# Altium PCB TM_DE_Display_REV1.0.PcbDoc (part 2 of 2)
Units mm, origin at the board's own origin, x right, y up, seen from the top; angles counter-clockwise.
Board outline 155.6 x 46.6 mm, 2 copper layers (Top Layer, Bottom Layer); 284 components, 274 nets, 1006 pads, 129 vias.
Unrouted connection lines stored in the file: 576.
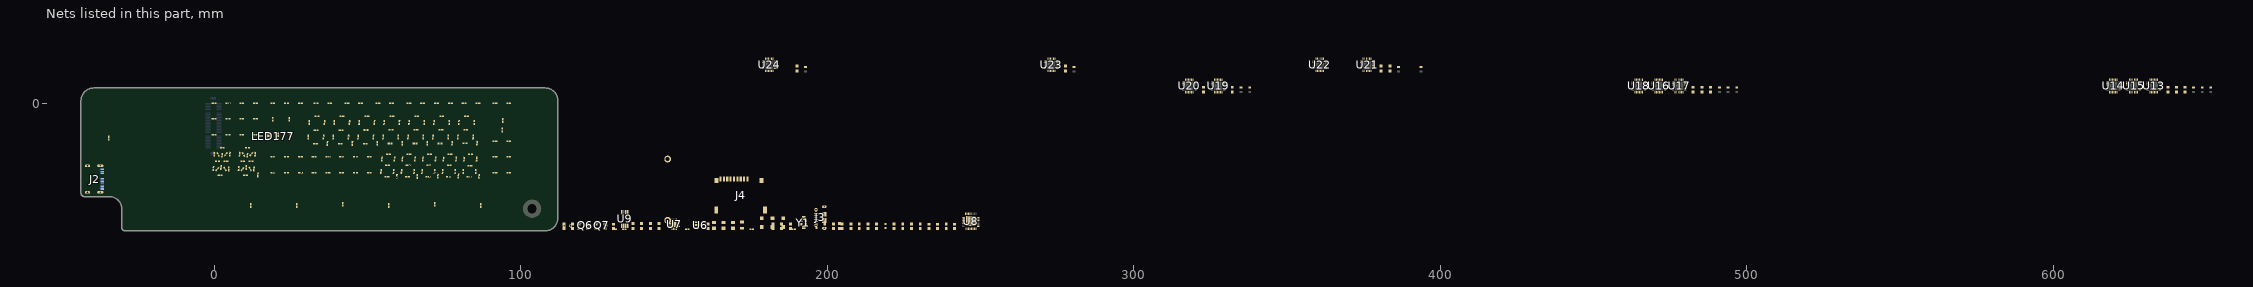
[diagram p2: the nets of this part, all layers, seen from the top]

## Part data
BT1: "BATTERY HOLDER FOR CR2032 HORIZONTAL FEMALE", MANUFACTURER=CONNFLY, Manufacturer Part Number=DS1092-04-B6P, Supplier 1=Ozdisan
C33: library part C01757, "CAP CER 1UF 25VDC %10 X5R SMD", MANUFACTURER=Samsung, Voltage=25V, Manufacturer Part Number=CL10A105KA8NNNC
C34 C35 C36: library part C01758, "MLCC (2012) 0805 22uF 10VDC ±20% X5R", MANUFACTURER=Samsung, Voltage=10V, Manufacturer Part Number=CL21A226MPCLRNC
C37 C38 C39 C40: "MLCC (1608) 0603 100nF 50VDC ±10% X7R", MANUFACTURER="Samsung Electro-Mechanics America, Inc", Manufacturer Part Number=CL10B104KB8NNNL, Supplier 1=OZDISAN
C41 C42 C43 C44 C55 C56 C79 C80 C81 C82 C83 C84 C85 C86 C87 C88 C89 C90: library part C01763, "CAP CER 100nF 50VDC %10 X7R SMD", MANUFACTURER=Samsung, Manufacturer Part Number=CL10B104KB8NNNL, Voltage=50V
C45 C52: library part C01763, "MLCC (1608) 0603 15pF 50VDC ±5% C0G (NP0)", MANUFACTURER=Samsung, Voltage=50V, Manufacturer Part Number=CL10C150JB8NNNC
C46 C49: library part C01763, "MLCC (1608) 0603 47pF 50VDC ±5% C0G (NP0)", MANUFACTURER=Samsung, Voltage=50V, Manufacturer Part Number=CL10C470JB8NNNC
C47 C50: library part C01763, "MLCC (1608) 0603 180pF 50VDC ±5% C0G (NP0)", MANUFACTURER=Samsung, Voltage=50V, Manufacturer Part Number=CL10C181JB8NNNC
C48 C51: "MLCC (1608) 0603 10pF 50VDC ±0.25pF C0G (NP0)", MANUFACTURER=SAMSUNG, Manufacturer Part Number=CL10C100CB8NNNC, Supplier 1=Ozdisan
C53 C54 C57 C58: "MLCC (1608) 0603 18pF 50VDC ±5% C0G (NP0)", MANUFACTURER="Samsung Electro-Mechanics America, Inc", Manufacturer Part Number=CL10C180JB8NNNC, Supplier 1=OZDISAN
D13: "DIODE SCHOTTKY 40V 1A SOD123", MANUFACTURER="Nexperia USA Inc.", Manufacturer Part Number=PMEG4010EGWJ
D14 D15 D16: "TVS Diode (Bi-directional)", MANUFACTURER="Comchip Technology", Manufacturer Part Number=ATV02W5V0B-HF
J1: "60 Position Connector Receptacle, Center Strip Contacts Surface Mount Gold", Package=None, Check_prices=https://www.snapeda.com/parts/DF12NB(3.0)-60DS-0.5V(51)/Hirose/view-part/?ref=eda, MF="Hirose Electric Co Ltd", MP=DF12NB(3.0)-60DS-0.5V(51), SnapEDA_Link=https://www.snapeda.com/parts/DF12NB(3.0)-60DS-0.5V(51)/Hirose/view-part/?ref=snap
J2: library part TYPE-C-31-M-12, "CONN RCPT Type-C 16POS SMD R/A", MANUFACTURER="SHOU HAN", Manufacturer Part Number="TYPE-C 16PIN 2MD(073)"
J3: "Micro USB, Input Output Connectors, B TYPE RECEPTACLE with flange", Package=None, Check_prices=https://www.snapeda.com/parts/10118194-0001LF/Amphenol+FCI/view-part/?ref=eda, MF="Amphenol ICC", MP=10118194-0001LF, SnapEDA_Link=https://www.snapeda.com/parts/10118194-0001LF/Amphenol+FCI/view-part/?ref=snap
J4: "Connector", Part Number=L-KLS1-TF-003-H1.85-R, Ordering=https://www.ozdisan.com/konnektor-baglanti-elemanlari/sim-sd-kart-konnektorleri/sd-kart-konnektorleri/L-KLS1-TF-003-H1-85-R, PRICE=0,26439, Unit=USD
L4 L5: "FIXED IND 2.2UH 700MA 300 MOHM", MANUFACTURER="Murata Electronics", Manufacturer Part Number=LQM18PN2R2NC0L
LED1 LED2 LED3 LED4 LED5 LED6 LED7 LED8 LED9 LED10 LED11 LED12 LED13 LED14 LED15 LED16 LED17 LED18 LED19 LED20 LED21 LED22 LED23 LED24 LED25 LED26 LED27 LED28 LED29 LED30 LED31 LED32 LED33 LED34 LED35 LED36 LED37 LED38 LED39 LED40 LED41 LED42 LED43 LED44 LED45 LED46 LED47 LED48 LED49 LED50 LED51 LED52 LED53 LED54 LED55 LED56 LED57 LED58 LED59 LED60 LED61 LED62 LED63 LED64 LED65 LED66 LED67 LED68 LED69 LED70 LED71 LED72 LED73 LED74 LED75 LED76 LED77 LED78 LED79 LED80 LED81 LED82 LED83 LED84 LED85 LED86 LED87 LED88 LED89 LED90 LED91 LED92 LED93 LED94 LED95 LED96 LED97 LED98 LED99 LED100 LED101 LED102 LED103 LED104 LED105 LED106 LED107 LED108 LED109 LED110 LED111 LED112 LED113 LED114 LED115 LED116 LED117 LED118 LED119 LED120 LED121 LED122 LED123 LED124 LED125 LED126 LED127 LED128 LED129 LED130 LED131 LED132 LED133 LED134 LED135 LED136 LED137 LED138 LED139 LED140 LED141 LED142 LED143 LED144 LED145 LED146 LED147 LED148 LED149 LED150 LED151 LED152 LED153 LED154 LED155 LED156 LED157 LED158 LED159 LED160 LED161 LED162 LED163 LED164 LED165 LED166 LED167 LED168 LED169 LED170 LED172 LED173 LED174 LED175 LED176 LED178 LED179 LED180 LED181 LED182 LED183 LED184 LED185 LED186 LED187 LED188 LED189: "LED RED WATER CLEAR 0402 SMD", MANUFACTURER=Kingbright, Manufacturer Part Number=YLED0402R
LED171: "LED WHITE YELLOW LENS 0402 SMD", MANUFACTURER=LITEON, Manufacturer Part Number=LTW-C283DS5
LED177: "LED", Manufacturer_Name=Lumileds, Mouser Part Number=997-L1MCRGB00280MP, Arrow Part Number=L1MC-RGB0028000MP0, Arrow Price/Stock=https://www.arrow.com/en/products/l1mc-rgb0028000mp0/lumileds.html?utm_currency=USD&region=nac, Datasheet Link=https://lumileds.com/wp-content/uploads/2022/03/DS388-luxeon-3528-rgb-datasheet.pdf, Height=1.85mm, Manufacturer_Part_Number=L1MC-RGB0028000MP0, Mouser Price/Stock=https://www.mouser.co.uk/ProductDetail/Lumileds/L1MC-RGB0028000MP0?qs=Znm5pLBrcAJSGF05jr80lQ%3D%3D
Q6 Q7: "TRANSISTOR DIS.500mA 300V NPN SOT23 GEN. SMT", MANUFACTURER=PANJIT, Package=SOT23, Supplier Part Number 1=3757-MMBTA42_R1_00001CT-ND, Manufacturer Part Number=MMBTA42_R1_00001, Supplier 1=DIGIKEY, Supplier 2=MOUSER, Supplier 3=OZDISAN, Supplier Part Number 3=MMBTA42_R1_00001
R32 R33 R35 R36 R37: library part R03000, "RES.(1005) 0402 10K Ohms 5% 1/16W 100PPM SMT", MANUFACTURER=YAGEO, Manufacturer Part Number=RC0402JR-0710KL
R34: library part R01913, "RES SMD 2.2M OHM 1% 1/8W 0805", MANUFACTURER=Yageo, Manufacturer Part Number=RC0805FR-072M2L
R38 R39: "RES.(1608) 0603 47K Ohms 1% 1/10W-S 100PPM", MANUFACTURER=ROYALOHM, Manufacturer Part Number=0603SAF4702T5E, Supplier 1=Ozdisan
R52 R55: library part R02995, "RES 0603 10k Ohms %1 1/10W 100PPM", MANUFACTURER=ROYALOHM, Manufacturer Part Number=0603SAF1002T5E
R53: library part R02995, "RES.(1608) 0603 820 Ohms 5% 1/10W-S 100PPM", MANUFACTURER=ROYALOHM, Manufacturer Part Number=0603SAJ0821T5E
R54: library part R02995, "RES 5.1K OHM 1% 1/10W 0603", MANUFACTURER=YAGEO, Manufacturer Part Number=RC0603FR-075K1L
R56 R57: "RES.(1608) 0603 330 Ohms 1% 1/10W-S 100PPM", MANUFACTURER=ROYALOHM, Manufacturer Part Number=0603SAF3300T5E, Supplier 1=Ozdisan
R77 R78 R79 R80 R81 R82 R83 R84 R85 R86 R87 R88: library part 0603SAF3301T5E, "RES.(1608) 0603 3.6K Ohms 1% 1/10W 100PPM SMT", MANUFACTURER=YAGEO, Manufacturer Part Number=RC0603FR-133K6L
U6: "Low Loss Power Distribution Switch", MANUFACTURER="DIOO Microcircuits", Manufacturer Part Number=DIO7002AST5
U7: "USB to High-Speed Serial Chip CH343", MANUFACTURER=WCH, Package=Package, Check_prices=https://www.snapeda.com/parts/CH343P/WCH/view-part/?ref=eda, Manufacturer Part Number=CH343P, SnapEDA_Link=https://www.snapeda.com/parts/CH343P/WCH/view-part/?ref=snap
U8: "Integrated Circuit", Manufacturer_Name=NXP, Mouser Part Number=771-MFRC52201HN1115, Arrow Part Number=MFRC52201HN1,115, Arrow Price/Stock=https://www.arrow.com/en/products/mfrc52201hn1115/nxp-semiconductors?utm_currency=USD&region=nac, Datasheet Link=https://media.digikey.com/pdf/Data%20Sheets/NXP%20PDFs/MFRC522.pdf, Height=1mm, Manufacturer_Part_Number=MFRC52201HN1,115, Mouser Price/Stock=https://www.mouser.co.uk/ProductDetail/NXP-Semiconductors/MFRC52201HN1115?qs=cbprxTG2Yq8gosQeFVBvCQ%3D%3D
U9: "Real Time Clock (RTC) IC Clock/Calendar 64B, 1Kb I²C, 2-Wire Serial 8-TSSOP, 8-MSOP (0.118\", 3.00mm Width)", MANUFACTURER="Microchip Technology", Manufacturer Part Number=MCP79410T-I/MS, Supplier 1=DIGIKEY
U13 U14 U15 U16 U17 U18 U19 U20 U21 U22 U23 U24: "Integrated Circuit", Manufacturer_Name=onsemi, Mouser Part Number=698-CAT4016HV6-GT2, Arrow Part Number=CAT4016HV6-GT2, Arrow Price/Stock=https://www.arrow.com/en/products/cat4016hv6-gt2/on-semiconductor, Datasheet Link=https://www.onsemi.com/download/data-sheet/pdf/cat4016-d.pdf, Height=0.8mm, Manufacturer_Part_Number=CAT4016HV6-GT2, Mouser Price/Stock=https://www.mouser.co.uk/ProductDetail/onsemi/CAT4016HV6-GT2?qs=rZgeL6XvLwaPp0eUTTX%2FiA%3D%3D
XTAL1: "CRYSTAL 32.768KHZ 12.5pF BULK 5ppm 3X8 EXT", MANUFACTURER=RALTRON, Manufacturer Part Number=R38-32.768-12.5-EXT-5PPM, Supplier 1=OZDISAN
Y1: "27.12 MHz ±10ppm Crystal 10pF 60 Ohms 4-SMD, No Lead", MANUFACTURER=ECS, Height=0.55mm, Manufacturer Part Number=ECS-271.2-10-37-CKM-TR

## Free pads (board coordinates)
  round 6 hole 3 mask+1: 6(103.734,-34.4)

## Via types
v1: diameter 0.254, hole 0.127, Top Layer to Bottom Layer, tented both sides, 128 vias
v2: diameter 0.6, hole 0.3, Top Layer to Bottom Layer, tented both sides, 1 vias

## Nets (pads, with @x,y where several pads share a name; then routed paths per layer and width w, separated by ;. In a path a pad name is that pad's centre, name@x,y a point inside that pad or via, vN(x,y) a via of type N, cw(c..) or ccw(c..) an arc to the next point about the centre after c; other vN are vias at no path point)
+3V3: C55.1 C56.2 J4.4 R55.1 U9.8
+3V3DC: C37.2 C38.2 C39.2 C44.2 R52.1 U7.1 U7.3 U7.6 U8.2 U8.3 U8.12 U8.15 U8.32
+5VDC: C79.1 C80.1 C81.1 C82.1 C83.1 C84.1 C85.1 C86.1 C87.1 C88.1 C89.1 C90.1 LED1.2 LED2.2 LED3.2 LED4.2 LED5.2 LED6.2 LED7.2 LED8.2 LED9.2 LED10.2 LED11.2 LED12.2 LED13.2 LED14.2 LED15.2 LED16.2 LED17.2 LED18.2 LED19.2 LED20.2 LED21.2 LED22.2 LED23.2 LED24.2 LED25.2 LED26.2 LED27.2 LED28.2 LED29.2 LED30.2 LED31.2 LED32.2 LED33.2 LED34.2 LED35.2 LED36.2 LED37.2 LED38.2 LED39.2 LED40.2 LED41.2 LED42.2 LED43.2 LED44.2 LED45.2 LED46.2 LED47.2 LED48.2 LED49.2 LED50.2 LED51.2 LED52.2 LED53.2 LED54.2 LED55.2 LED56.2 LED57.2 LED58.2 LED59.2 LED60.2 LED61.2 LED62.2 LED63.2 LED64.2 LED65.2 LED66.2 LED67.2 LED68.2 LED69.2 LED70.2 LED71.2 LED72.2 LED73.2 LED74.2 LED75.2 LED76.2 LED77.2 LED78.2 LED79.2 LED80.2 LED81.2 LED82.2 LED83.2 LED84.2 LED85.2 LED86.2 LED87.2 LED88.2 LED89.2 LED90.2 LED91.2 LED92.2 LED93.2 LED94.2 LED95.2 LED96.2 LED97.2 LED98.2 LED99.2 LED100.2 LED101.2 LED102.2 LED103.2 LED104.2 LED105.2 LED106.2 LED107.2 LED108.2 LED109.2 LED110.2 LED111.2 LED112.2 LED113.2 LED114.2 LED115.2 LED116.2 LED117.2 LED118.2 LED119.2 LED120.2 LED121.2 LED122.2 LED123.2 LED124.2 LED125.2 LED126.2 LED127.2 LED128.2 LED129.2 LED130.2 LED131.2 LED132.2 LED133.2 LED134.2 LED135.2 LED136.2 LED137.2 LED138.2 LED139.2 LED140.2 LED141.2 LED142.2 LED143.2 LED144.2 LED145.2 LED146.2 LED147.2 LED148.2 LED149.2 LED150.2 LED151.2 LED152.2 LED153.2 LED154.2 LED155.2 LED156.2 LED157.2 LED158.2 LED159.2 LED160.2 LED161.2 LED162.2 LED163.2 LED164.2 LED165.2 LED166.2 LED167.2 LED168.2 LED170.2 LED171.2 LED174.2 LED176.2 LED177.2 LED177.4 LED177.6 LED180.2 LED182.2 R35.2 U6.3 U6.5 U13.24 U14.24 U15.24 U16.24 U17.24 U18.24 U19.24 U20.24 U21.24 U22.24 U23.24 U24.24
  other v1: 19.55,-17.5 37.549,-17.5 46.549,-17.5 24.734,-10.4
/km1: LED168.1 U22.9
/km2: LED170.1 U22.10
A1: LED17.1 U15.5
A2: LED47.1 U18.5
A_1: LED1.1 U13.5
A_2: LED31.1 U13.13
A_3: LED62.1 U16.5
A_4: LED78.1 U16.13
A_5: LED94.1 U20.5
A_6: LED110.1 U20.13
A_7: LED9.1 U14.5
A_8: LED39.1 U14.13
A_9: LED70.1 U17.5
A_10: LED86.1 U17.13
A_11: LED102.1 U19.5
A_12: LED118.1 U19.13
B1: LED18.1 U15.6
B2: LED48.1 U18.6
B_1: LED2.1 U13.6
B_2: LED32.1 U13.14
B_3: LED63.1 U16.6
B_4: LED79.1 U16.14
B_5: LED95.1 U20.6
B_6: LED111.1 U20.14
B_7: LED10.1 U14.6
B_8: LED40.1 U14.14
B_9: LED71.1 U17.6
B_10: LED87.1 U17.14
B_11: LED103.1 U19.6
B_12: LED119.1 U19.14
Bed1: LED156.1 U22.15
C1: LED19.1 U15.7
C2: LED49.1 U18.7
C_1: LED3.1 U13.7
C_2: LED33.1 U13.15
C_3: LED64.1 U16.7
C_4: LED80.1 U16.15
C_5: LED96.1 U20.7
C_6: LED112.1 U20.15
C_7: LED11.1 U14.7
C_8: LED41.1 U14.15
C_9: LED72.1 U17.7
C_10: LED88.1 U17.15
  other v1: 71.884,-22.693
C_11: LED104.1 U19.7
  other v1: 78.591,-22.708
C_12: LED120.1 U19.15
CHF1: LED144.1 U21.11
CHF2: LED147.1 U21.12
Clock1: LED160.1 U22.16
D1: LED20.1 U15.8
D2: LED50.1 U18.8
D_1: LED4.1 U13.8
D_2: LED34.1 U13.16
D_3: LED65.1 U16.8
D_4: LED81.1 U16.16
D_5: LED97.1 U20.8
D_6: LED113.1 U20.16
D_7: LED12.1 U14.8
D_8: LED42.1 U14.16
D_9: LED73.1 U17.8
D_10: LED89.1 U17.16
  other v1: 70.192,-23.928
D_11: LED105.1 U19.8
  other v1: 76.9,-23.943
D_12: LED121.1 U19.16
  other v1: 83.607,-23.957
Distance1: LED169.1 U24.5
Distance2: LED172.1 U24.6
Distance3: LED173.1 U24.7
Distance4: LED175.1 U24.8
Distance5: LED178.1 U24.9
Distance6: LED179.1 U24.10
  other v1: 28.55,-22.6
Distance7: LED181.1 U24.11
Distance8: LED183.1 U24.12
  other v1: 19.55,-22.6
DP2: LED61.1 U18.19
DP_1: LED8.1 U13.12
DP_2: LED38.1 U13.20
DP_3: LED69.1 U16.12
DP_4: LED85.1 U16.20
DP_5: LED101.1 U20.12
DP_6: LED117.1 U20.20
DP_7: LED16.1 U14.12
DP_8: LED46.1 U14.20
  other v1: 59.568,-24.256
DP_9: LED77.1 U17.12
DP_10: LED93.1 U17.20
DP_11: LED109.1 U19.12
DP_12: LED125.1 U19.20
DTR: Q6.2 R37.2 R38.1 U7.12
E1: LED21.1 U15.9
E2: LED51.1 U18.9
E_1: LED5.1 U13.9
E_2: LED35.1 U13.17
E_3: LED66.1 U16.9
E_4: LED82.1 U16.17
E_5: LED98.1 U20.9
E_6: LED114.1 U20.17
E_7: LED13.1 U14.9
E_8: LED43.1 U14.17
E_9: LED74.1 U17.9
E_10: LED90.1 U17.17
E_11: LED106.1 U19.9
E_12: LED122.1 U19.17
EARTH: J2.S1 J2.S2 J2.S3 J2.S4 R34.1
EEM1: LED165.1 U15.19
EEM2: LED167.1 U15.20
EuroBOT1: LED180.1 U22.13
EuroBOT2: LED182.1 U22.14
EuroTOP1: LED162.1 U22.7
EuroTOP2: LED164.1 U22.8
Extras1: LED139.1 U21.13
Extras2: LED142.1 U21.14
  other v1: 42.049,-17.5
Extras3: LED145.1 U21.15
Extras4: LED148.1 U21.16
Extras5: LED149.1 U21.17
Extras6: LED152.1 U21.18
Extras7: LED154.1 U21.19
Extras8: LED155.1 U21.20
F1: LED22.1 U15.10
F2: LED52.1 U18.10
F_1: LED6.1 U13.10
F_2: LED36.1 U13.18
F_3: LED67.1 U16.10
F_4: LED83.1 U16.18
F_5: LED99.1 U20.10
F_6: LED115.1 U20.18
F_7: LED14.1 U14.10
F_8: LED44.1 U14.18
F_9: LED75.1 U17.10
F_10: LED91.1 U17.18
F_11: LED107.1 U19.10
F_12: LED123.1 U19.18
Fare1: LED127.1 U21.5
Fare2: LED130.1 U21.6
Fare3: LED133.1 U21.7
Fare4: LED137.1 U21.8
Fare5: LED138.1 U21.9
Fare6: LED141.1 U21.10
Forhere1: LED140.1 U23.17
Forhere2: LED143.1 U23.18
Forhere3: LED146.1 U23.19
G1.1: LED23.1 U15.11
G1.2: LED24.1 U15.12
G2.1: LED53.1 U18.11
G2.2: LED54.1 U18.12
G_1: LED7.1 U13.11
G_2: LED37.1 U13.19
G_3: LED68.1 U16.11
G_4: LED84.1 U16.19
G_5: LED100.1 U20.11
G_6: LED116.1 U20.19
G_7: LED15.1 U14.11
G_8: LED45.1 U14.19
G_9: LED76.1 U17.11
  other v1: 63.751,-20.265
G_10: LED92.1 U17.19
  other v1: 70.451,-20.275
G_11: LED108.1 U19.11
G_12: LED124.1 U19.19
GND: BT1.1 C33.2 C34.2 C35.2 C36.2 C37.1 C38.1 C39.1 C40.1 C42.1 C43.1 C44.1 C46.2 C47.2 C48.1 C49.1 C50.1 C51.2 C53.1 C54.1 C55.2 C56.1 C57.1 C58.1 C79.2 C80.2 C81.2 C82.2 C83.2 C84.2 C85.2 C86.2 C87.2 C88.2 C89.2 C90.2 D14.1 D15.1 D16.1 J2.A1_B12 J2.B1_A12 J3.4 J3.5 J3.SH1 J3.SH2 J3.SH3 J3.SH4 J3.SH5 J3.SH6 J4.6 J4.10 R32.1 R33.1 R34.2 U6.2 U7.2 U7.17 U8.1 U8.4 U8.5 U8.10 U8.14 U8.18 U8.33 U9.4 U13.1 U14.1 U15.1 U16.1 U17.1 U18.1 U19.1 U20.1 U21.1 U22.1 U23.1 U24.1 Y1.2 Y1.4
H1: LED25.1 U15.13
H2: LED55.1 U18.13
Hired1: LED126.1 U23.5
Hired2: LED129.1 U23.6
Hired3: LED132.1 U23.7
Hired4: LED135.1 U23.8
J1: LED26.1 U15.14
J2: LED56.1 U18.14
K1: LED27.1 U15.15
K2: LED57.1 U18.15
km1: LED174.1 U22.11
km2: LED176.1 U22.12
L1: LED28.1 U15.16
L2: LED58.1 U18.16
LED_BLANK: U13.21 U14.21 U15.21 U16.21 U17.21 U18.21 U19.21 U20.21
LED_DATA_OUT1: U13.22 U16.2
LED_DATA_OUT2: U16.22 U20.2
LED_DATA_OUT3: U14.2 U20.22
LED_DATA_OUT4: U14.22 U17.2
LED_DATA_OUT5: U17.22 U19.2
LED_DATA_OUT6: U15.2 U19.22
LED_DATA_OUT7: U15.22 U18.2
LED_DATA_OUT9: U21.22 U23.2
LED_DATA_OUT10: U23.22 U24.2
LED_DATA_OUT11: U22.2 U24.22
LED_DR_CLK: U13.3 U14.3 U15.3 U16.3 U17.3 U18.3 U19.3 U20.3
LED_DR_DATA: U13.2
LED_DR_LATCH: U13.4 U14.4 U15.4 U16.4 U17.4 U18.4 U19.4 U20.4
M1: LED29.1 U15.17
M2: LED59.1 U18.17
N1: LED30.1 U15.18
N2: LED60.1 U18.18
NetBT1_2: BT1.2 U9.3
NetC34_1: C34.1 C35.1 C36.1 J3.1 U6.1
NetC41_2: C41.2 R54.2
NetC45_2: C45.2 C46.1 L4.2
NetC49_2: C49.2 C52.2 L5.2
NetC57_2: C57.2 U9.1 XTAL1.2
NetC58_2: C58.2 U9.2 XTAL1.1
NetJ2_A5: J2.A5 R32.2
NetJ2_B5: J2.B5 R33.2
NetLED169_2: LED169.2 LED172.2 LED173.2 LED175.2 LED178.2 LED179.2 LED181.2 LED183.2
NetLED184_2: LED184.2 LED185.2 LED186.2 LED187.2 LED188.2 LED189.2
NetQ6_1: Q6.1 R36.1 R38.2
NetQ6_3: Q6.3
NetQ7_1: Q7.1 R37.1 R39.2
NetQ7_3: Q7.3
NetR35_1: R35.1 U6.4
NetR56_1: R56.1 U9.6
NetR57_1: R57.1 U9.5
NetR77_1: R77.1 U13.23
NetR78_1: R78.1 U14.23
NetR79_1: R79.1 U15.23
NetR80_1: R80.1 U16.23
NetR81_1: R81.1 U17.23
NetR82_1: R82.1 U18.23
NetR83_1: R83.1 U19.23
NetR84_1: R84.1 U20.23
NetR85_1: R85.1 U21.23
NetR86_1: R86.1 U22.23
NetR87_1: R87.1 U23.23
NetR88_1: R88.1 U24.23
NetU18_22: U18.22 U21.2
NFC1: LED171.1 U22.17
NH1: LED157.1 U22.5
NH2: LED158.1 U22.6
OSCIN: C53.2 U8.21 Y1.1
OSCOUT: C54.2 U8.22 Y1.3
Rate1: LED159.1 U23.13
Rate2: LED161.1 U23.14
Rate3: LED163.1 U23.15
Rate4: LED166.1 U23.16
RF_ANT1: C41.1 C45.1 C47.1 C48.2
RF_ANT2: C50.2 C51.1 C52.1
RFID_CS: U8.24
RFID_IRQ: U8.23
RFID_MISO: U8.31
RFID_MOSI: U8.30
RFID_RST: C43.2 R52.2 U8.6
RFID_SCK: U8.29
RGB_Blue: LED177.5 U22.18
RGB_Green: LED177.1 U22.20
RGB_Red: LED177.3 U22.19
RTC_I2C_SCL: R56.2
RTC_I2C_SDA: R57.2
RTS: Q7.2 R36.2 R39.1 U7.13
RX: R53.2 R54.1 U8.17
Service1: LED151.1 U23.20
  other v1: 19.134,-5.2
SSP0_DETECT: J4.9 R55.2
SSP_CLK: J4.5
SSP_CMD: J4.3
SSP_DATA0: J4.7
SSP_DATA1: J4.8
SSP_DATA2: J4.1
SSP_DATA3: J4.2
Stopped1: LED128.1 U23.9
Stopped2: LED131.1 U23.10
Stopped3: LED134.1 U23.11
  other v1: 4.95,0
Stopped4: LED136.1 U23.12
Taxi1: LED150.1 U24.19
Taxi2: LED153.1 U24.20
Touch1: LED184.1 U24.13
Touch2: LED185.1 U24.14
Touch3: LED186.1 U24.15
Touch4: LED187.1 U24.16
Touch5: LED188.1 U24.17
Touch6: LED189.1 U24.18
TX1: L4.1 U8.11
TX2: L5.1 U8.13
USB2UART_RX: U7.5
USB2UART_TX: U7.4
USB_5V: C33.1 C40.2 D13.1 U7.9
USB_DBG_D_N: D16.2 J2.A7 J2.B7 U7.8
USB_DBG_D_P: D15.2 J2.A6 J2.B6 U7.7
USBD_N: J3.3
USBD_N: J3.2
VBUSA: D13.2 D14.2 J2.A4_B9 J2.B4_A9
VMID: C42.2 R53.1 U8.16
pads on no net: J1.1 J1.2 J1.3 J1.4 J1.5 J1.6 J1.7 J1.8 J1.9 J1.10 J1.11 J1.12 J1.13 J1.14 J1.15 J1.16 J1.17 J1.18 J1.19 J1.20 J1.21 J1.22 J1.23 J1.24 J1.25 J1.26 J1.27 J1.28 J1.29 J1.30 J1.31 J1.32 J1.33 J1.34 J1.35 J1.36 J1.37 J1.38 J1.39 J1.40 J1.41 J1.42 J1.43 J1.44 J1.45 J1.46 J1.47 J1.48 J1.49 J1.50 J1.51 J1.52 J1.53 J1.54 J1.55 J1.56 J1.57 J1.58 J1.59 J1.60 J1.S1 J1.S2 J2. J2.A8 J2.B8 J4.0 R77.2 R78.2 R79.2 R80.2 R81.2 R82.2 R83.2 R84.2 R85.2 R86.2 R87.2 R88.2 U7.10 U7.11 U7.14 U7.15 U7.16 U8.7 U8.8 U8.9 U8.19 U8.20 U8.25 U8.26 U8.27 U8.28 U9.7 U13.25 U14.25 U15.25 U16.25 U17.25 U18.20 U18.25 U19.25 U20.25 U21.3 U21.4 U21.21 U21.25 U22.3 U22.4 U22.21 U22.22 U22.25 U23.3 U23.4 U23.21 U23.25 U24.3 U24.4 U24.21 U24.25
copper on no net: | length 346.1
  Top Layer w0.254: -42.85,-17.49 ccw(c-41.58,-17.49) -41.58,-18.76 -41.072,-18.76 -35.992,-18.76 cw(c-35.992,-20.03) -34.722,-20.03 -34.722,-23.078 -34.722,-27.65 ccw(c-32.436,-27.65) -32.436,-29.936 -32.182,-29.936 cw(c-32.182,-32.476) -29.642,-32.476 -29.642,-38.826 ccw(c-28.118,-38.826) -28.118,-40.35 -25.578,-40.35 ccw(c-25.578,-38.826) -24.054,-38.826 -24.054,-24.094 -24.054,1.56 ccw(c-26.594,1.56) -26.594,4.1 -38.786,4.1 -40.31,4.1 ccw(c-40.31,1.56) -42.85,1.56 -42.85,0.036 -42.85,-16.474 -42.85,-17.49 ; -42.088,-16.982 ccw(c-40.818,-16.982) -40.818,-18.252 -35.484,-18.252 cw(c-35.484,-19.522) -34.214,-19.522 -34.214,-28.158 ccw(c-32.944,-28.158) -32.944,-29.428 -30.15,-29.428 cw(c-30.15,-30.698) -28.88,-30.698 -28.88,-38.572 ccw(c-28.118,-38.572) -28.118,-39.334 -25.578,-39.334 ccw(c-25.578,-38.826) -25.07,-38.826 -25.07,1.814 ccw(c-26.34,1.814) -26.34,3.084 -40.818,3.084 ccw(c-40.818,1.814) -42.088,1.814 -42.088,0.29 -42.088,-16.982 ; -41.58,-15.966 ccw(c-41.326,-15.966) -41.326,-16.22 ccw(c-40.056,-16.22) -40.056,-17.49 -34.722,-17.49 cw(c-34.722,-18.76) -33.452,-18.76 -33.452,-28.158 ccw(c-32.69,-28.158) -32.69,-28.92 -29.388,-28.92 cw(c-29.388,-29.936) -28.372,-29.936 -28.372,-38.064 ccw(c-27.61,-38.064) -27.61,-38.826 -26.086,-38.826 ccw(c-26.086,-38.318) -25.578,-38.318 -25.578,1.306 ccw(c-26.848,1.306) -26.848,2.576 -40.31,2.576 ccw(c-40.31,1.306) -41.58,1.306 -41.58,0.29 -41.58,-15.966
  other v1: 63.492,-23.918 85.299,-22.723 81.211,-22.704 65.183,-22.684 67.796,-22.674 74.503,-22.689 61.095,-22.665 24.05,-22.6 33.05,-22.6 37.549,-22.6 42.049,-22.6 46.549,-22.6 51.049,-22.6 92.05,-22.6 96.55,-22.6 83.866,-20.304 77.159,-20.29 74.79,-18.684 81.498,-18.699 61.382,-18.66 68.083,-18.669 85.604,-18.662 72.189,-18.632 78.896,-18.647 65.488,-18.623 24.05,-17.5 28.55,-17.5 33.05,-17.5 51.049,-17.5 92.05,-17.5 96.55,-17.5 84.069,-16.678 70.654,-16.649 77.362,-16.664 63.954,-16.639 45.044,-13.519 53.183,-13.513 61.319,-13.497 69.462,-13.497 77.601,-13.491 85.737,-13.475 41.589,-13.147 49.727,-13.14 57.863,-13.125 66.007,-13.125 74.145,-13.118 82.281,-13.102 92.05,-12.4 96.55,-12.4 38.796,-11.487 46.934,-11.481 55.07,-11.465 63.214,-11.465 43.774,-11.462 51.913,-11.455 60.049,-11.44 68.192,-11.44 71.353,-11.459 79.489,-11.443 76.331,-11.433 84.467,-11.418 0.45,-10.2 4.95,-10.2 9.45,-10.2 13.95,-10.2 41.853,-8.727 49.991,-8.721 58.127,-8.705 66.271,-8.705 74.409,-8.698 82.545,-8.683 39.126,-6.763 44.104,-6.763 47.265,-6.756 52.243,-6.756 55.4,-6.741 60.379,-6.741 63.544,-6.741 68.523,-6.741 71.683,-6.734 76.661,-6.734 79.819,-6.719 84.797,-6.719 24.534,-5.2 0.45,-5.1 4.95,-5.1 9.45,-5.1 13.95,-5.1 42.132,-4.287 50.271,-4.28 58.407,-4.265 66.55,-4.265 74.689,-4.258 82.825,-4.243 19.55,0 24.05,0 28.55,0 33.65,0 38.15,0 43.75,0 48.25,0 53.85,0 58.35,0 63.95,0 68.45,0 72.95,0 77.5,0 81.999,0 86.499,0 92.05,0 96.55,0
  other v2: -0.266,1.6

## Silkscreen, mask and mechanical layers (free items; w line width, h text height)
Top Overlay:
  circle w0.254: c86.934,-33.4 r4.5
  circle w0.254: c71.934,-33.4 r4.5
  circle w0.254: c56.934,-33.4 r4.5
  circle w0.254: c41.934,-33.4 r4.5
  circle w0.254: c26.934,-33.4 r4.5
  lines w0.254: -43.466,0.903 -43.466,5 -39.369,5 ; 7.434,-33.4 ccw(c11.934,-33.4) 11.934,-37.9 ccw(c11.934,-33.4) 16.434,-33.4 ccw(c11.934,-33.4) 11.934,-28.9 ccw(c11.934,-33.4) 7.434,-33.4
Mechanical 1:
  lines w0.254: -30.169,-40.6 -30.169,-34.516 ccw(c-34.266,-34.516) -34.266,-30.419 -42.446,-30.419 cw(c-42.446,-29.4) -43.466,-29.4 -43.466,-7.5 -43.466,0.903 cw(c-39.369,0.903) -39.369,5 108.037,5 cw(c108.037,0.903) 112.134,0.903 112.134,-15.5 112.134,-37.503 cw(c108.037,-37.503) 108.037,-41.6 -29.146,-41.6 ; -30.166,-40.58 ccw(c-29.146,-40.58) -29.146,-41.599
Mechanical 15:
  drawing of 366 lines, arcs and shapes, not listed
  text "KASSE" at -2.066,-1.9 h4.3
  text "FREI" at 17.034,-1.9 h4.3
  text "EZA" at 31.034,-1.9 h4.5
  text "N/F" at 41.234,-1.9 h4.3
  text "FAHRPREIS" at 61.234,-1.9 h4.3
  text "km" at 89.534,-1.9 h4.3
  text "BESETZT" at -2.066,-7 h4.3
  text "€" at 89.534,-10.5 h9
  text "TARIF" at -3.324,-12.1 h4.3
  text "CHF" at 89.534,-14.3 h4.3
  text "ZUSCHLAG" at 32.134,-19.4 h4.3
  text "€" at 89.534,-19.4 h4.3
  text "WEGSTRECKE" at 26.334,-24.5 h4.3
  text "/km" at 89.534,-24.5 h4.3

## Text inside footprints (layer, text, board x,y; h text height)
J2: Mechanical 13 "PCB EDGE" at -43.236,-19.525 h0.61 r270
J3: Mechanical 13 "PCB EDGE" at 200.325,-33 h0.81 r90